# Allegro board mib_rev2_v58.brd
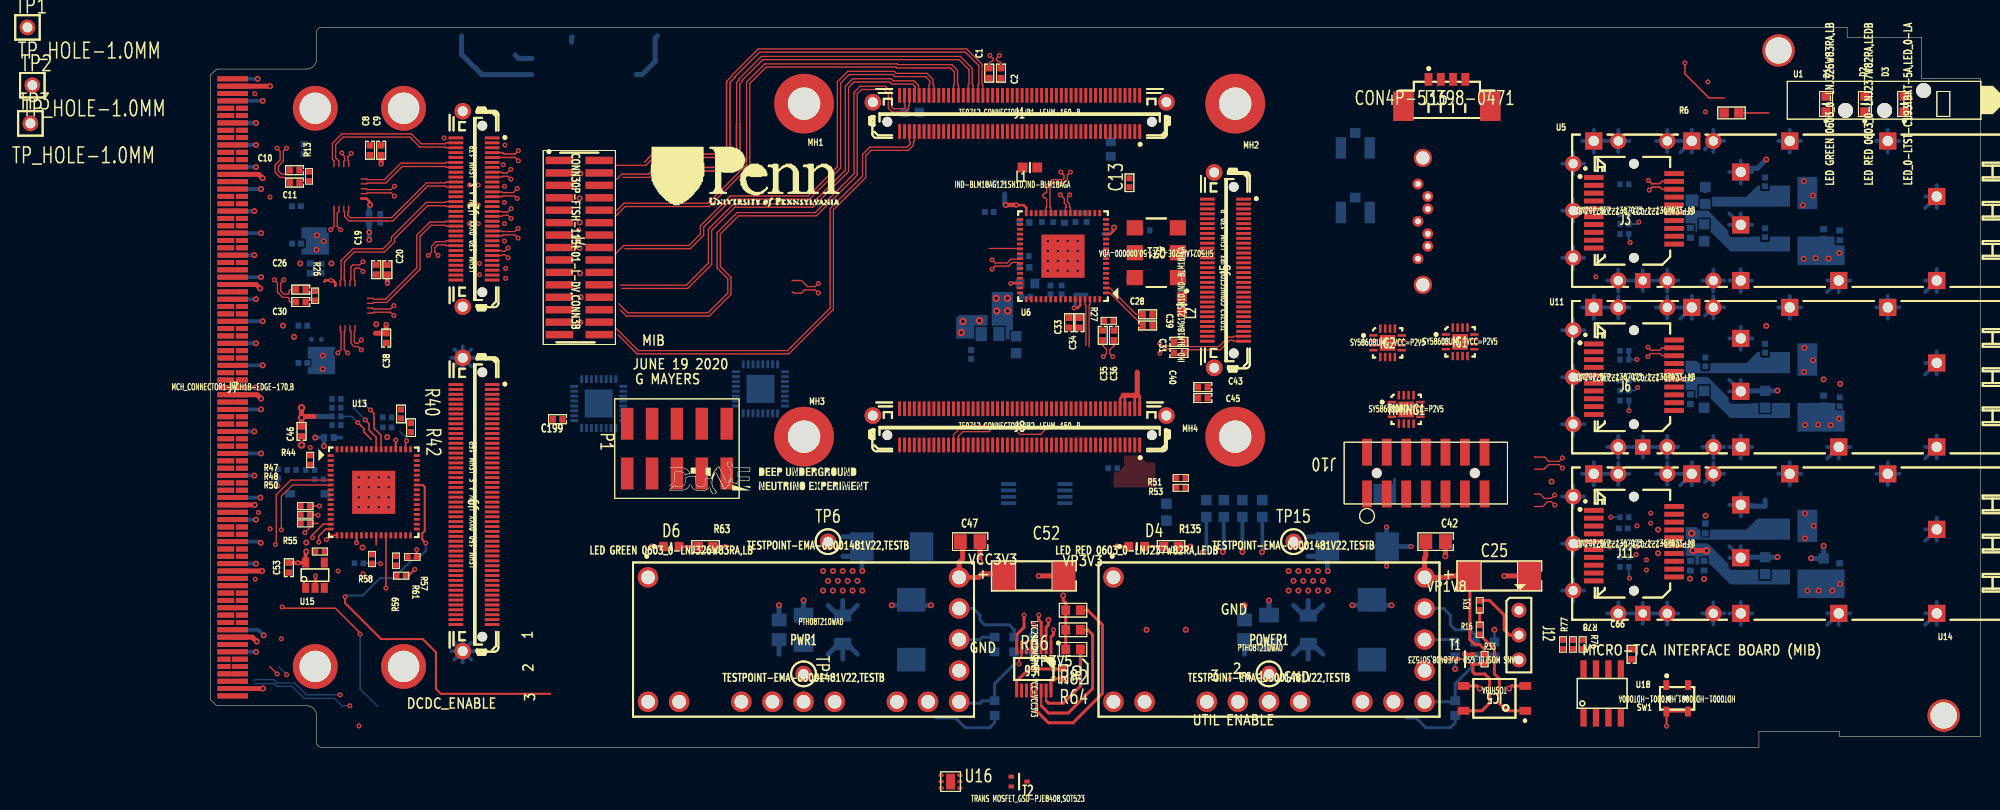
[diagram p0: board, top side]
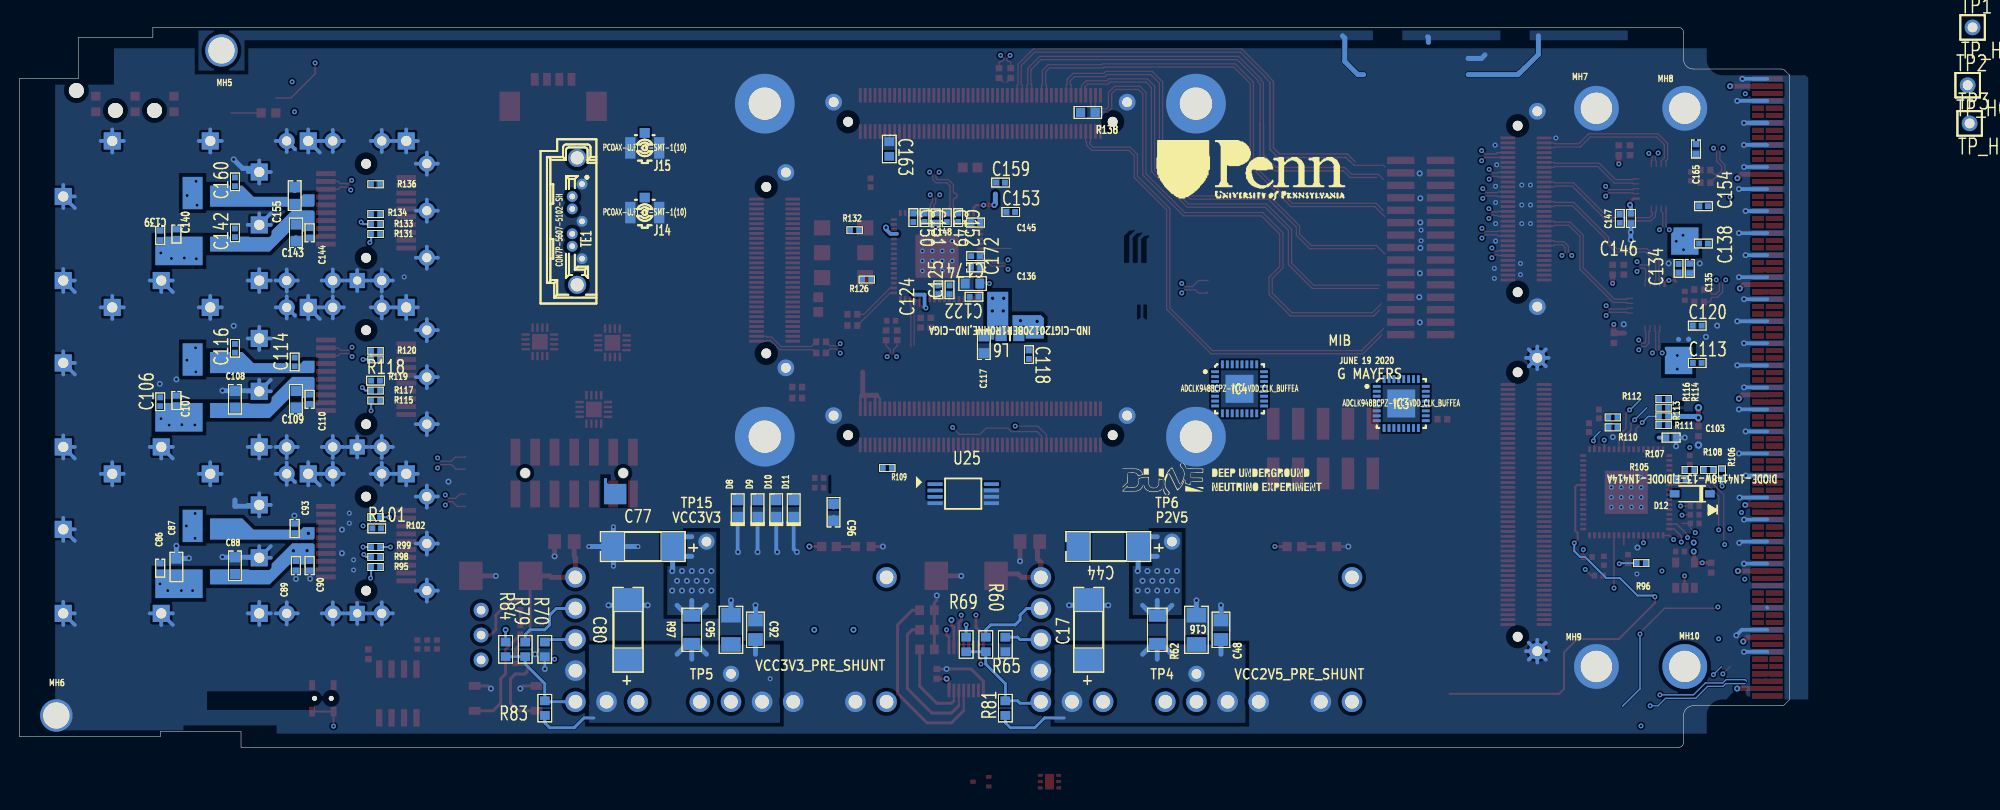
[diagram p1: board, bottom side, seen from below]

Outline 180.6 x 73.5 mm; copper layers: TOP, 02_GND, 03_SIG1, 04_GND, 05_PWR1, 06_GND, 07_SIG2, 08_GND, 09_SIG3, BOTTOM. Coordinates in mm from the lower left corner of the outline.
Outline path: 0,68.65 0.46,69.11 arc(0.62,69.21) 0.8,69.25 0.83,69.25 9.8,69.25 arc(10.51,69.54) 10.8,70.25 10.8,73.01 arc(10.95,73.36) 11.3,73.5 167,73.5 167,72.5 174.6,72.5 174.6,68.3 180.6,68.3 180.6,1.1 166.24,1.1 166.24,1.6 158,1.6 158,0 11.27,0 arc(11.06,0.06) 10.89,0.21 arc(10.82,0.34) 10.8,0.49 10.8,3.26 arc(10.5,3.96) 9.8,4.25 0.8,4.25 arc(0.62,4.29) 0.46,4.39 0,4.85 0,68.65

## Design rules (mm)
constraint set DEFAULT: min track width 0.127
net group AMC_N_PS: nets AMC_N_PS<0> AMC_N_PS<1>
net group AUXIO_0: nets AUXIO_N0 AUXIO_P0
net group AUXIO_1: nets AUXIO_N1 AUXIO_P1
net group AUXIO_2: nets AUXIO_N2 AUXIO_P2
net group AUXIO_3: nets AUXIO_N3 AUXIO_P3
net group AUXIO_4: nets AUXIO_N4 AUXIO_P4
net group AUXIO_5: nets AUXIO_N5 AUXIO_P5
net group AUXIO_6: nets AUXIO_N6 AUXIO_P6
net group AUXIO_7: nets AUXIO_N7 AUXIO_P7
net group CLKIN_N<2>: nets CLKIN_N<2> CLKIN_P<2>
net group DP_AUX_GBE_RX: nets AUX_GBE_RX_N AUX_GBE_RX_P
net group DP_AUX_GBE_TX: nets AUX_GBE_TX_N AUX_GBE_TX_P
net group DP_CLK0: nets CLK_N<0> CLK_P<0>
net group DP_CLK1: nets CLK_N<1> CLK_P<1>
net group DP_CLK_TST: nets CLK_TST_N CLK_TST_P
net group DP_DATA_IN0: nets DATA_IN_N<0> DATA_IN_P<0>
net group DP_DATA_IN1: nets DATA_IN_N<1> DATA_IN_P<1>
net group DP_DATA_IN2: nets DATA_IN_N<2> DATA_IN_P<2>
net group DP_DATA_IN3: nets DATA_IN_N<3> DATA_IN_P<3>
net group DP_DATA_IN4: nets DATA_IN_N<4> DATA_IN_P<4>
net group DP_DATA_IN5: nets DATA_IN_N<5> DATA_IN_P<5>
net group DP_DATA_IN6: nets DATA_IN_N<6> DATA_IN_P<6>
net group DP_DATA_IN7: nets DATA_IN_N<7> DATA_IN_P<7>
net group DP_DATA_IN8: nets DATA_IN_N<8> DATA_IN_P<8>
net group DP_DATA_IN9: nets DATA_IN_N<9> DATA_IN_P<9>
net group DP_DATA_IN10: nets DATA_IN_N<10> DATA_IN_P<10>
net group DP_DATA_IN11: nets DATA_IN_N<11> DATA_IN_P<11>
net group DP_DATA_OUT0: nets DATA_OUT_N<0> DATA_OUT_P<0>
net group DP_DATA_OUT1: nets DATA_OUT_N<1> DATA_OUT_P<1>
net group DP_DATA_OUT2: nets DATA_OUT_N<2> DATA_OUT_P<2>
net group DP_DATA_OUT3: nets DATA_OUT_N<3> DATA_OUT_P<3>
net group DP_DATA_OUT4: nets DATA_OUT_N<4> DATA_OUT_P<4>
net group DP_DATA_OUT5: nets DATA_OUT_N<5> DATA_OUT_P<5>
net group DP_DATA_OUT6: nets DATA_OUT_N<6> DATA_OUT_P<6>
net group DP_DATA_OUT7: nets DATA_OUT_N<7> DATA_OUT_P<7>
net group DP_DATA_OUT8: nets DATA_OUT_N<8> DATA_OUT_P<8>
net group DP_DATA_OUT9: nets DATA_OUT_N<9> DATA_OUT_P<9>
net group DP_DATA_OUT10: nets DATA_OUT_N<10> DATA_OUT_P<10>
net group DP_DATA_OUT11: nets DATA_OUT_N<11> DATA_OUT_P<11>
net group DP_DC_REF_CLK0: nets DC_REF_CLK_N<0> DC_REF_CLK_P<0>
net group DP_DC_REF_CLK1: nets DC_REF_CLK_N<1> DC_REF_CLK_P<1>
net group DP_DC_REF_CLK2: nets DC_REF_CLK_N<2> DC_REF_CLK_P<2>
net group DP_DC_REF_CLK3: nets DC_REF_CLK_N<3> DC_REF_CLK_P<3>
net group DP_DC_REF_CLK4: nets DC_REF_CLK_N<4> DC_REF_CLK_P<4>
net group DP_DC_REF_CLK5: nets DC_REF_CLK_N<5> DC_REF_CLK_P<5>
net group DP_DC_REF_CLK6: nets DC_REF_CLK_N<6> DC_REF_CLK_P<6>
net group DP_DC_REF_CLK7: nets DC_REF_CLK_N<7> DC_REF_CLK_P<7>
net group DP_DC_REF_CLK8: nets DC_REF_CLK_N<8> DC_REF_CLK_P<8>
net group DP_DC_REF_CLK9: nets DC_REF_CLK_N<9> DC_REF_CLK_P<9>
net group DP_DC_REF_CLK10: nets DC_REF_CLK_N<10> DC_REF_CLK_P<10>
net group DP_DC_REF_CLK11: nets DC_REF_CLK_N<11> DC_REF_CLK_P<11>
net group DP_DFF_REF_CLK0: nets DFF_REF_CLK_N<0> DFF_REF_CLK_P<0>
net group DP_DFF_REF_CLK1: nets DFF_REF_CLK_N<1> DFF_REF_CLK_P<1>
net group DP_DFF_REF_CLK2: nets DFF_REF_CLK_N<2> DFF_REF_CLK_P<2>
net group DP_GBE_RX: nets GBE_RX_N GBE_RX_P
net group DP_GBE_TX: nets GBE_TX_N GBE_TX_P
net group DP_REF_CLK0: nets REF_CLK_N<0> REF_CLK_P<0>
net group DP_REF_CLK1: nets REF_CLK_N<1> REF_CLK_P<1>
net group DP_REF_CLK2: nets REF_CLK_N<2> REF_CLK_P<2>
net group DP_REF_CLK3: nets REF_CLK_N<3> REF_CLK_P<3>
net group DP_REF_CLK4: nets REF_CLK_N<4> REF_CLK_P<4>
net group DP_REF_CLK5: nets REF_CLK_N<5> REF_CLK_P<5>
net group DP_REF_CLK6: nets REF_CLK_N<6> REF_CLK_P<6>
net group DP_REF_CLK7: nets REF_CLK_N<7> REF_CLK_P<7>
net group DP_REF_CLK8: nets REF_CLK_N<8> REF_CLK_P<8>
net group DP_REF_CLK9: nets REF_CLK_N<9> REF_CLK_P<9>
net group DP_REF_CLK10: nets REF_CLK_N<10> REF_CLK_P<10>
net group DP_REF_CLK11: nets REF_CLK_N<11> REF_CLK_P<11>
net group DP_SFP2_CLKGEN: nets SFP2_CLKGEN_N SFP2_CLKGEN_P
net group DP_SFP_TD0: nets SFP_TD_N<0> SFP_TD_P<0>
net group DP_SFP_TD1: nets SFP_TD_N<1> SFP_TD_P<1>
net group DP_SFP_TD2: nets SFP_TD_N<2> SFP_TD_P<2>
net group DP_TIMING.UPSTREAM_DATA0: nets TIMING.UPSTREAM_DATA_N<0> TIMING.UPSTREAM_DATA_P<0>
net group DP_TIMING.UPSTREAM_DATA1: nets TIMING.UPSTREAM_DATA_N<1> TIMING.UPSTREAM_DATA_P<1>
net group DPDATA_FROM_UPSTREAM0: nets DATA_FROM_UPSTREAM_N<0> DATA_FROM_UPSTREAM_P<0>
net group DPDATA_FROM_UPSTREAM1: nets DATA_FROM_UPSTREAM_N<1> DATA_FROM_UPSTREAM_P<1>
net group DPDATA_FROM_UPSTREAM2: nets DATA_FROM_UPSTREAM_N<2> DATA_FROM_UPSTREAM_P<2>
net group DPDFF_CLK0: nets DFF_CLK_N<0> DFF_CLK_P<0>
net group DPDFF_CLK1: nets DFF_CLK_N<1> DFF_CLK_P<1>
net group DPDFF_CLK2: nets DFF_CLK_N<2> DFF_CLK_P<2>
net group DPSCOPE: nets SCOPE_N SCOPE_P
net group DPSFP_DATA_OUT0: nets SFP_DATA_OUT_N<0> SFP_DATA_OUT_P<0>
net group DPSFP_DATA_OUT1: nets SFP_DATA_OUT_N<1> SFP_DATA_OUT_P<1>
net group DPSFP_DATA_OUT2: nets SFP_DATA_OUT_N<2> SFP_DATA_OUT_P<2>
net group DPSFP_RD0: nets SFP_RD_N<0> SFP_RD_P<0>
net group DPSFP_RD1: nets SFP_RD_N<1> SFP_RD_P<1>
net group DPSFP_RD2: nets SFP_RD_N<2> SFP_RD_P<2>
net group DPUDATA_IN0: nets UDATA_IN_N<0> UDATA_IN_P<0>
net group DPUDATA_IN1: nets UDATA_IN_N<1> UDATA_IN_P<1>
net group DPUDATA_IN2: nets UDATA_IN_N<2> UDATA_IN_P<2>
net group RCLK_N0: nets RCLK_N0 REFCLK_OUT0_N
net group RCLK_N1: nets RCLK_N1 REFCLK_OUT1_N
net group RCLK_P0: nets RCLK_P0 REFCLK_OUT0_P
net group RCLK_P1: nets RCLK_P1 REFCLK_OUT1_P
net group VP12: nets PRESENCE_12V VP12
net group AMC_GA: nets AMC_GA<0> AMC_GA<1> AMC_GA<2>
net group BP_1: nets AMC_N_ENABLE IMPB_SCL IMPB_SDA PWR_ON TCK_2 TDI_2 TDO_2 TMS_2
net group CLKGEN_IO_1: nets CLK_INTR CLK_LOL CLK_RST CLK_SCL CLK_SDA CLK_SEL0 CLK_SEL1
net group CLKIN_N<0>: nets CLKIN_N<0> CLKIN_P<0> SFP0_CLKGEN_N SFP0_CLKGEN_P
net group CLKIN_N<1>: nets CLKIN_N<1> CLKIN_P<1> SFP1_CLKGEN_N SFP1_CLKGEN_P
net group CLKIN_N<3>: nets CLKIN_N<3> CLKIN_P<3> FBCLK_N FBCLK_P
net group POWER: nets DCDC_2V5_PG DCDC_3V3_PG DCDC_ENABLE LDO_1V8_PG SENSE_I2C_SCL SENSE_I2C_SDA
net group SFP_LOS: nets SFP_LOS<0> SFP_LOS<1> SFP_LOS<2>
net group SFP_RATE_SELECT: nets SFP_RATE_SELECT<0> SFP_RATE_SELECT<1> SFP_RATE_SELECT<2>
net group SFP_SCL: nets SFP_SCL<0> SFP_SCL<1> SFP_SCL<2>
net group SFP_SDA: nets SFP_SDA<0> SFP_SDA<1> SFP_SDA<2>
net group SFP_TX_DISABLE: nets SFP_TX_DISABLE<0> SFP_TX_DISABLE<1> SFP_TX_DISABLE<2>
net group SFP_TX_FAULT: nets SFP_TX_FAULT<0> SFP_TX_FAULT<1> SFP_TX_FAULT<2>
net group TIMING.UPSTREAM_DATA_N: nets TIMING.UPSTREAM_DATA_N<2>
net group TIMING.UPSTREAM_DATA_P: nets TIMING.UPSTREAM_DATA_P<2>
net group UPSTREAM_DATA_N_: nets UPSTREAM_DATA_N_<0> UPSTREAM_DATA_N_<1> UPSTREAM_DATA_N_<2>
net group UPSTREAM_DATA_P: nets UPSTREAM_DATA_P<0> UPSTREAM_DATA_P<1> UPSTREAM_DATA_P<2>

## Placement (name value [footprint] x y rotation side)
C1  0.1UF  [CAP0402]  79.46 68.83 90 top
C2  0.1UF  [CAP0402]  80.65 68.83 90 top
C8  100nF  [CAP0402]  16.26 60.96 90 top
C9  1UF  [CAP0402]  17.4 60.96 90 top
C10  0.1UF  [CAP0402]  8.56 58.93 0 top
C11  0.1UF  [CAP0402]  8.56 57.66 0 top
C13  100nF  [C0402]  93.77 57.64 90 top
C16  100UF  [CAP1206]  60.51 12 90 bottom
C17  470UF  [CAP2917]  71.51 12 90 bottom
C19  100nF  [CAP0402]  16.9 48.77 90 top
C20  1UF  [CAP0402]  18.04 48.77 90 top
C25  470UF  [CAP2917]  131.51 17.5 0 top
C26  0.1UF  [CAP0402]  9.2 46.74 0 top
C28  0.1UF  [CAP0402]  95.62 44.21 180 top
C30  0.1UF  [CAP0402]  9.2 45.47 0 top
C31  0.1UF  [CAP0402]  95.62 43.07 180 top
C33  0.1UF  [CAP0402]  87.61 43.35 270 top
C34  0.1UF  [CAP0402]  88.66 43.35 270 top
C35  0.1UF  [CAP0402]  91.04 42.06 90 top
C36  0.1UF  [CAP0402]  92.18 42.06 90 top
C38  1UF  [CAP0402]  17.91 41.78 270 top
C39  0.1UF  [CAP0402]  98.81 41.4 180 top
C40  0.1UF  [CAP0402]  98.81 40.26 180 top
C42  0.1UF  [CAP0805]  125.01 21 0 top
C43  0.1UF  [CAP0402]  101.25 36.78 0 top
C44  470UF  [CAP2917]  69.51 20.5 0 bottom
C45  0.1UF  [CAP0402]  101.25 35.66 0 top
C46  0.47UF  [CAP0402]  9.28 32.26 270 top
C47  0.1UF  [CAP0805]  77.51 21 0 top
C48  0.1UF  [CAP0805]  58.01 12 90 bottom
C52  470UF  [CAP2917]  84.01 17.5 0 top
C53  0.1UF  [CAP0402]  7.98 18.34 270 top
C66  0.1UF  [CAP0402]  145.01 9.5 270 top
C77  470UF  [CAP2917]  117.01 20.5 0 bottom
C80  470UF  [CAP2917]  118.51 12 90 bottom
C86  0.1UF  [CAP0402]  166.25 18.29 90 bottom
C87  10UF  [CAP0603]  164.6 18.41 90 bottom
C88  22UF  [CAP0603]  158.63 18.54 90 bottom
C89  1UF  [CAP0402]  152.41 18.54 270 bottom
C90  0.1UF  [CAP0402]  151.01 18.54 270 bottom
C91  0.1UF  [CAP0402]  87.01 7.5 270 top
C92  0.1UF  [CAP0805]  105.51 12 90 bottom
C93  0.1UF  [CAP0402]  152.53 22.35 90 bottom
C95  100UF  [CAP1206]  108.01 12 90 bottom
C96  22UF  [CAP0603]  97.54 24 270 bottom
C103  0.1UF  [CAP0402]  12.07 31.62 180 bottom
C106  100nF  [C0402]  166.25 35.28 90 bottom
C107  0.1UF  [CAP0402]  164.6 35.41 90 bottom
C108  10UF  [CAP0603]  158.63 35.53 90 bottom
C109  22UF  [CAP0603]  152.41 35.53 270 bottom
C110  1UF  [CAP0402]  151.01 35.53 270 bottom
C113  100nF  [C0402]  9.4 39.24 180 bottom
C114  1uF  [C0402]  152.53 39.34 90 bottom
C116  1uF  [C0402]  158.63 40.74 90 bottom
C117  22UF  [CAP0603]  82.21 41.1 270 bottom
C118  1uF  [C0402]  77.61 40.1 270 bottom
C120  100nF  [C0402]  9.4 43.05 180 bottom
C122  100nF  [C0402]  83.21 46 0 bottom
C124  1nF  [C0402]  86.85 46.71 90 bottom
C125  1nF  [C0402]  85.7 46.71 90 bottom
C134  1uF  [C0402]  11.31 48.9 90 bottom
C135  100nF  [CAP0402]  10.17 48.9 90 bottom
C136  100nF  [CAP0402]  83.04 49 0 bottom
C138  100nF  [C0402]  8.77 51.44 180 bottom
C139  100nF  [CAP0402]  166.25 52.27 90 bottom
C140  0.1UF  [CAP0402]  164.6 52.4 90 bottom
C142  100nF  [C0402]  158.63 52.53 90 bottom
C143  22UF  [CAP0603]  152.41 52.53 270 bottom
C144  1UF  [CAP0402]  151.01 52.53 270 bottom
C145  0.1UF  [CAP0402]  83.04 53.58 0 bottom
C146  100nF  [C0402]  17.3 54 270 bottom
C147  1UF  [CAP0402]  16.16 54 270 bottom
C148  100nF  [CAP0402]  87.13 54.05 270 bottom
C149  100nF  [C0402]  85.98 54.08 270 bottom
C150  100nF  [C0402]  89.39 54.08 270 bottom
C151  100nF  [C0402]  88.25 54.08 270 bottom
C152  100nF  [C0402]  84.82 54.08 270 bottom
C153  100nF  [C0402]  79.46 54.66 180 bottom
C154  100nF  [C0402]  8.77 55.24 180 bottom
C155  10UF  [CAP0603]  152.53 56.34 90 bottom
C159  100nF  [C0402]  80.5 57.66 180 bottom
C160  1uF  [C0402]  158.63 57.73 90 bottom
C163  10uF  [C0603]  91.85 61.09 270 bottom
C165  100nF  [CAP0402]  9.53 61.09 90 bottom
C172  10uF  [C0603]  83.36 47.35 180 bottom
C174  100nF  [C0402]  83.04 50.15 0 bottom
C199  100nF  [CAP0402]  35.41 33.5 0 top
D1  GREEN  [LEDC1608X80N]  164.85 65.68 90 top
D2  RED  [LEDC1608X80N]  168.81 65.68 90 top
D3  LTST-C170TBKT  [LEDC1608X80N]  172.83 65.68 90 top
D4  RED  [LEDC1608X80N]  94.51 20.5 0 top
D6  GREEN  [LEDC1608X80N]  47.01 20.5 0 top
D8  PGB1010603NR  [D0603]  107.32 24.38 90 bottom
D9  PGB1010603NR  [D0603]  105.29 24.38 90 bottom
D10  PGB1010603NR  [D0603]  103.39 24.38 90 bottom
D11  PGB1010603NR  [D0603]  101.61 24.38 90 bottom
D12  1N4148  [SOD123]  9.91 25.88 0 bottom
IC1  -  [QFN50P300X300X90-17N-S160]  127.51 41.4 0 top
IC2  -  [QFN50P300X300X90-17N-S160]  120.11 41.3 0 top
IC3  -  [QFN50P500X500X100-33N-S285]  39.61 35.1 180 bottom
IC4  -  [QFN50P500X500X100-33N-S285]  56.11 36.6 180 bottom
IC5  -  [TOSHIBA_11-4M1S]  131.01 5 180 top
IC6  -  [SOP50P490X110-16N]  84.01 8 270 top
J1  LSHM-150-03.0-L-DV-A-S-K-TR  [SAMTEC_LSHM-150-04-0-L-DV-A-S]  82.56 64.77 0 top
J2  LSHM-130-03.0-L-DV-A-S-K-TR  [SAMTEC_LSHM-130-04-0-L-DV-A-S]  26.83 54.97 90 top
J3  1367073-1  [TYCO_1367073]  145.24 54.78 0 top
J4  -  [FTSH-115-01-L-DV]  37.62 51.66 270 top
J5  LSHM-130-03.0-L-DV-A-S-K-TR  [SAMTEC_LSHM-130-04-0-L-DV-A-S]  103.51 48.72 90 top
J6  1367073-1  [TYCO_1367073]  145.24 37.79 0 top
J7  MCH_TG1-EDGE-170  [AMC0_R2_BPLUS_PCB_EDGE]  2.25 36.75 0 top
J8  LSHM-150-03.0-L-DV-A-S-K-TR  [SAMTEC_LSHM-150-04-0-L-DV-A-S]  82.56 32.77 0 top
J9  LSHM-150-03.0-L-DV-A-S-K-TR  [SAMTEC_LSHM-150-04-0-L-DV-A-S]  26.83 24.79 90 top
J10  7X2RECPT_SMD_2MM  [HDR14PINSMD]  124.01 28 180 top
J11  1367073-1  [TYCO_1367073]  145.24 20.8 0 top
J12  HDR1X3  [HDR_1X3]  133.51 14 270 top
J14  -  [HIROSE_U-FL-R-SMT-1_10]  116.81 54.6 180 bottom
J15  -  [HIROSE_U-FL-R-SMT-1_10]  116.81 61.2 180 bottom
J16  -  [MOLEX_53398-0471]  124.91 66.4 0 top
L1  120  OHM@100MHZ  [INDC1608X95N]  83.61 59.2 0 top
L2  120  OHM@100MHZ  [INDC1608X95N]  99.11 45.2 90 top
L6  1 UH  [INDC2013X105N]  79.54 42.2 0 bottom
MH1  MT_HOLE  [MOUNTHOLE]  60.56 65.72 0 top
MH2  MT_HOLE  [MOUNTHOLE]  104.56 65.72 0 top
MH3  MT_HOLE  [MOUNTHOLE]  60.56 31.72 0 top
MH4  MT_HOLE  [MOUNTHOLE]  104.56 31.72 0 top
MH5  MT_HOLE  [MOUNTHOLE]  160 71.15 180 bottom
MH6  MT_HOLE  [MOUNTHOLE]  176.85 3.25 180 bottom
MH7  MT_HOLE  [MOUNTHOLE]  19.69 65.25 180 bottom
MH8  MT_HOLE  [MOUNTHOLE]  10.67 65.25 180 bottom
MH9  MT_HOLE  [MOUNTHOLE]  19.69 8.26 180 bottom
MH10  MT_HOLE  [MOUNTHOLE]  10.67 8.26 180 bottom
NOREF  -  []  -27.5 136.85 0 top
NOREF#2  -  []  10.8 72.31 0 top
NOREF#3  -  []  12.04 125.75 90 top
NOREF#4  -  []  5.36 4.25 90 top
NOREF#5  -  []  0.92 4.25 90 top
NOREF#6  -  []  153.74 4.81 0 top
NOREF#7  -  []  153.92 4.25 0 top
NOREF#8  -  []  -27.5 124.03 0 top
NOREF#9  -  []  46.82 25.83 0 top
NOREF#10  -  []  15.11 0 90 top
NOREF#11  -  []  157.38 0 90 top
NOREF#12  -  []  44.48 53.98 0 top
NOREF#13  -  []  23.75 102.67 90 top
NOREF#14  -  []  -26.64 123.32 0 top
NOREF#15  -  []  158 0.73 0 top
NOREF#16  -  []  161.05 4 90 top
NOREF#17  -  []  0 64.12 0 top
NOREF#18  -  []  178.32 68.3 90 top
NOREF#19  -  []  167 73.04 0 top
NOREF#20  -  []  0 39.45 0 top
NOREF#21  -  []  -255.82 -99.62 0 top
NOREF#22  -  []  65.03 54.66 180 bottom
NOREF#23  -  []  68.05 25.73 180 bottom
NOREF#24  -  []  12.32 141.05 270 bottom
P1  RECP5X2  [RECPT5X2_100MIL_SM]  42.51 30.5 270 top
POWER1  -  [PWS_TI_ECP-R-PDSS-T14]  108.01 11 0 top
PWR1  -  [PWS_TI_ECP-R-PDSS-T14]  60.51 11 0 top
QZ1  50MHz  [OSCSC254P500X700X100-6N]  96.51 50.5 180 top
R6  160 OHM  [RES0603]  155.2 64.77 180 top
R13  4.99K  [RES0402]  10.04 58.29 270 top
R16  24.9  [RES0402]  129.51 12 90 top
R26  0  [RES0402]  10.67 46.1 270 top
R27  100  [RES0402]  91.66 43.55 0 top
R31  24.9  [RES0402]  129.51 14.5 90 top
R33  150K  [RES0402]  130.01 9 270 top
R40  1k  [C0402]  19.44 34.04 270 top
R42  1k  [C0402]  20.45 32.64 270 top
R44  33K  [RES0402]  10.17 29.34 270 top
R47  33K  [RES0402]  9.66 24.64 0 top
R48  24.9  [RES0402]  9.66 23.75 0 top
R50  24.9  [RES0402]  9.66 22.86 0 top
R51  24.9  [RES0402]  99.01 27.5 180 top
R53  24.9  [RES0402]  99.01 26.5 180 top
R55  49.9  [RES0402]  11.16 19.99 0 top
R57  33K  [RES0402]  20.58 19.43 180 top
R58  2.2K  [RES0402]  16.46 19.23 270 top
R59  4.99K  [RES0402]  18.93 19.05 270 top
R60  1.6k  [C0603]  80.01 10.5 90 bottom
R61  33K  [RES0402]  19.44 17.53 180 top
R62  0.005  [RES1206]  64.51 12 90 bottom
R63  249 OHM  [RES0603]  50.51 20.5 0 top
R64  00  [C0603]  88.01 12 0 top
R65  XX  [C0603]  82.01 10.5 270 bottom
R66  00  [C0603]  88.01 10 0 top
R69  00  [C0603]  84.01 10.5 90 bottom
R70  1.6k  [C0603]  127.01 10 90 bottom
R76  -  [RES0402]  140.01 10.5 90 top
R77  0  [RES0402]  138.01 10.5 270 top
R78  -  [RES0402]  139.01 10.5 90 top
R79  XX  [C0603]  129.01 10 270 bottom
R81  XX  [C0603]  80.01 4 90 bottom
R82  00  [C0603]  88.01 14 0 top
R83  XX  [C0603]  127.01 4 90 bottom
R84  00  [C0603]  131.01 10 90 bottom
R95  4.99K  [RES0402]  144.28 18.41 180 bottom
R96  4.99K  [RES0402]  15.12 18.8 0 bottom
R97  0.005  [RES1206]  112.01 12 90 bottom
R98  4.99K  [RES0402]  144.28 19.43 180 bottom
R99  4.99K  [RES0402]  144.28 20.45 180 bottom
R101  1k  [C0402]  144.16 22.35 180 bottom
R102  33  [RES0402]  144.28 23.5 180 bottom
R105  330  [RES0402]  11.05 27.36 0 bottom
R106  10K  [RES0402]  6.86 27.94 270 bottom
R107  1K  [RES0402]  10.17 28.32 180 bottom
R108  1K  [RES0402]  8.26 28.32 0 bottom
R109  1K  [RES0402]  92.05 28.5 180 bottom
R110  30K  [RES0402]  18.01 32.66 180 bottom
R111  150K  [RES0402]  12.83 32.89 0 bottom
R112  4.99K  [RES0402]  18.01 33.68 0 bottom
R113  1K  [RES0402]  12.83 33.78 0 bottom
R114  4.99K  [RES0402]  12.83 34.67 0 bottom
R115  4.99K  [RES0402]  144.28 35.41 180 bottom
R116  4.99K  [RES0402]  12.83 35.56 0 bottom
R117  4.99K  [RES0402]  144.28 36.42 180 bottom
R118  1k  [C0402]  144.28 37.44 180 bottom
R119  2.2K  [RES0402]  144.28 39.6 180 bottom
R120  2.2K  [RES0402]  144.28 40.49 180 bottom
R126  2.2K  [RES0402]  94.14 47.76 0 bottom
R131  4.99K  [RES0402]  144.28 52.4 180 bottom
R132  4.99K  [RES0402]  95.39 52.79 180 bottom
R133  4.99K  [RES0402]  144.28 53.42 180 bottom
R134  100  [RES0402]  144.28 54.43 180 bottom
R135  249 OHM  [RES0603]  98.01 20.5 0 top
R136  10K  [RES0402]  144.28 57.48 180 bottom
R138  10M  [RES0603]  71.58 64.82 180 bottom
SW1  HDT0001  [SW_HDT0001]  149.65 5 180 top
T1  -  [SOTFL50P160X60-3N]  128.01 9 180 top
T2  -  [SOTFL50P160X60-3N]  82.51 -3.5 0 top
TE1  -  [3M_5607-5102-SH]  123.71 53.7 90 bottom
TIMING1  -  [QFN50P300X300X90-17N-S160]  122.01 34.5 0 top
TP1  -  [TP_HOLE_10]  -18.69 73.5 0 top
TP2  -  [TP_HOLE_10]  -18.19 67.6 0 top
TP3  -  [TP_HOLE_10]  -18.39 63.7 0 top
TP4  5002 WHITE  [TP_KEYSTONE_5000A]  60.51 7.5 0 top
TP5  5002 WHITE  [TP_KEYSTONE_5000A]  108.01 7.5 0 top
TP6  5002 WHITE  [TP_KEYSTONE_5000A]  63.01 21 0 top
TP15  5002 WHITE  [TP_KEYSTONE_5000A]  110.51 21 0 top
U1  5151230F  [LP_515XXX]  170.82 65.02 270 top
U5  2227023-1  [SFP_CAGE]  145.24 54.78 180 top
U6  SI5395A-A-GM  [QFN_64]  86.98 50.15 180 top
U11  2227023-1  [SFP_CAGE]  145.24 37.79 180 top
U13  ATMEGA128A-MU  [QFN_64]  16.64 26.04 0 top
U14  2227023-1  [SFP_CAGE]  145.24 20.8 180 top
U15  SN74LVC1G06  [SOT23-5]  10.65 17.58 90 top
U16  TPS74618PQWDRVRQ1  [6-WSON_2X2]  75.51 -3.5 0 top
U18  24AA025E48T-I/SN  [SOIC8]  142.01 5.5 90 top
U25  LM75AIMME/NOPB  [TSSOP8_65P440X300MM]  84.31 25.9 180 bottom

## Library data of the parts
C1 C2 C39 C40 C43 C45 = CAP_NP_0: Tolerance: TOL?; User Part Number: 445-7348-2-ND; part number: CAP_NP_0-445-7348-2-ND,CAP_NP_0; room: TE0712
C8 C139 C148 C165 = CAPCERSMDCL2: Tolerance: 10%; User Part Number: CC0402_100NF_16V_10%_X7R; part number: CAPCERSMDCL2_0402-100NF,16V_GEN; tolerance: 10%; room: CLK_FO_6_11
C9 C147 = CAP_NP: Tolerance: TOL?; User Part Number: GRM152R60J105ME15D; part number: CAP_NP-GRM152R60J105ME15D,CAP_NP; room: CLK_FO_6_11
C10 C11 = CAP_NP_0: Tolerance: TOL?; User Part Number: 445-7348-2-ND; part number: CAP_NP_0-445-7348-2-ND,CAP_NP_0; room: CLK_FO_0_5
C13 C106 C113 C120 C122 = CAPCERSMDCL2: part number: CAPCERSMDCL2_0402-100NF,16V_GEN; tolerance: 10%; room: SFP_DFF_AND_FANOUT
C16 C95 = CAP_NP: Tolerance: TOL?; User Part Number: GRM31CD80J107ME39K; part number: CAP_NP-GRM31CD80J107ME39K,CAP_NP; room: MAIN_PWR
C17 C25 C44 C52 C77 C80 = CAP_POL: part number: CAP_POL-6TPE470MAZU,CAP_POL; room: MAIN_PWR
C19 C135 C136 C199 = CAPCERSMDCL2: Tolerance: 10%; User Part Number: CC0402_100NF_16V_10%_X7R; part number: CAPCERSMDCL2_0402-100NF,16V_GEN; tolerance: 10%; room: CLK_FO_0_5
C20 C38 = CAP_NP: Tolerance: TOL?; User Part Number: GRM152R60J105ME15D; part number: CAP_NP-GRM152R60J105ME15D,CAP_NP; room: CLK_FO_0_5
C26 C30 = CAP_NP_0: Tolerance: TOL?; User Part Number: 445-7348-2-ND; part number: CAP_NP_0-445-7348-2-ND,CAP_NP_0; room: CLK_FO_6_11
C28 C31 C33-C36 = CAP_NP_0: Tolerance: TOL?; User Part Number: 445-7348-2-ND; part number: CAP_NP_0-445-7348-2-ND,CAP_NP_0; room: CLK_GEN_X12
C42 C47 C48 C92 = CAP_NP: Tolerance: TOL?; User Part Number: 445-8173-1-ND; part number: CAP_NP-445-8173-1-ND,CAP_NP; room: MAIN_PWR
C46 = CAP_NP: Tolerance: TOL?; User Part Number: GRM155R60J474KE19J; part number: CAP_NP-GRM155R60J474KE19J,CAP_NP; room: MMC_DISCRETE
C53 C93 = CAP_NP: Tolerance: TOL?; User Part Number: C0402C104K9RACTU; part number: CAP_NP-C0402C104K9RACTU,CAP_NP; room: MMC_DISCRETE
C66 = CAP_NP: Tolerance: TOL?; User Part Number: 445-7348-2-ND; part number: CAP_NP-445-7348-2-ND,CAP_NP; room: EEPROM
C86 C90 C107 C140 C145 = CAP_NP: Tolerance: TOL?; User Part Number: 445-7348-2-ND; part number: CAP_NP-445-7348-2-ND,CAP_NP; room: SFP0
C87 C108 = CAP_NP: Tolerance: TOL?; User Part Number: GRM188R61A106KE69D; part number: CAP_NP-GRM188R61A106KE69D,CAP_NP; room: SFP0
C88 C96 C109 C117 C143 = CAP_NP: Tolerance: TOL?; User Part Number: GRM188R60J226MEA0D; part number: CAP_NP-GRM188R60J226MEA0D,CAP_NP; room: SFP0
C89 C110 C144 = CAP_NP: Tolerance: TOL?; User Part Number: GRT155R61E105ME01D; part number: CAP_NP-GRT155R61E105ME01D,CAP_NP; room: SFP0
C91 = CAP_NP_0: Tolerance: TOL?; User Part Number: 445-7348-2-ND; part number: CAP_NP_0-445-7348-2-ND,CAP_NP_0; room: MAIN_PWR
C103 = CAP_NP: Tolerance: TOL?; User Part Number: 445-7348-2-ND; part number: CAP_NP-445-7348-2-ND,CAP_NP; room: JTAG
C114 C116 C118 = CAPCERSMDCL2: part number: CAPCERSMDCL2_0402-1UF,16V; tolerance: 10%; room: SFP_DFF_AND_FANOUT
C124 C125 = CAPCERSMDCL2: part number: CAPCERSMDCL2_0402-1NF_X7R,50V; tolerance: 10%; room: SFP_DFF_AND_FANOUT
C134 C160 = CAPCERSMDCL2: part number: CAPCERSMDCL2_0402-1UF,16V; tolerance: 10%; room: CLK_GEN_X12
C138 C142 C146 C149-C154 C159 C174 = CAPCERSMDCL2: part number: CAPCERSMDCL2_0402-100NF,16V_GEN; tolerance: 10%; room: CLK_GEN_X12
C155 = CAP_NP: Tolerance: TOL?; User Part Number: GRM188R61A106KE69D; part number: CAP_NP-GRM188R61A106KE69D,CAP_NP; room: CLK_FO_6_11
C163 C172 = CAPCERSMDCL2: part number: CAPCERSMDCL2_0603-10UF,6.3V; tolerance: 20%; room: CLK_GEN_X12
D1 = LED GREEN 0603_0: part number: LED GREEN 0603_0-LNJ326W83RA,LED GREEN 0603_0; room: MMC
D2 = LED RED 0603_0: part number: LED RED 0603_0-LNJ237W82RA,LED RED 0603_0; room: MMC
D3 = LED_0: part number: LED_0-LTST-C193TBKT-5A,LED_0; room: MMC
D4 = LED RED 0603_0: part number: LED RED 0603_0-LNJ237W82RA,LED RED 0603_0; room: VCC3V3I_V
D6 = LED GREEN 0603_0: part number: LED GREEN 0603_0-LNJ326W83RA,LED GREEN 0603_0; room: POWER
D8-D11 = TVS_2X: Tolerance: TOL?; part number: TVS_2X-PGB1010603NR,TVS_2X; room: JTAG
D12 = DIODE: part number: DIODE-1N4148W-13-F,DIODE; room: MMC_DISCRETE
IC1 IC2 TIMING1 = SY58608U: part number: SY58608UMG; room: SFP_DFF_AND_FANOUT
IC3 = ADCLK948: part number: ADCLK948BCPZ; room: CLK_FO_0_5
IC4 = ADCLK948: part number: ADCLK948BCPZ; room: CLK_FO_6_11
IC5 = OPTOCOUPLER_AC_EC: part number: TOSHIBA; room: POWER
IC6 = LTC2991: part number: LTC2991CMS#PBF; room: POWER
J1 = TE0712 CONNECTOR-JB1: part number: TE0712 CONNECTOR-JB1-LSHM-150-03.0-L-DV-A-S-K-TR,TE0712 CONNECTOR-JB1
J2 = LSHM-130-0XXX-L-DV-A-S: part number: LSHM-130-0XXX-L-DV-A-S-LSHM-130-03.0-L-DV-A-S-K-TR,LSHM-130-0XXX-L-DV-A-S
J3 J6 J11 = CON20P_SFP-1367073-1: part number: CON20P_SFP-1367073-1-1367073-1,CON20P_SFP-1367073-1; room: SFP0
J4 = CONN30P: part number: CONN30P-FTSH-115-01-L-DV,CONN30P
J5 = TE0712 CONNECTOR-JB3: part number: TE0712 CONNECTOR-JB3-LSHM-130-03.0-L-DV-A-S-K-TR,TE0712 CONNECTOR-JB3
J7 = MCH_CONNECTOR1: part number: MCH_CONNECTOR1-MCH1B-EDGE-170,MCH_CONNECTOR1
J8 = TE0712 CONNECTOR-JB2: part number: TE0712 CONNECTOR-JB2-LSHM-150-03.0-L-DV-A-S-K-TR,TE0712 CONNECTOR-JB2
J9 = LSHM-150-0XXX-L-DV-A-S: part number: LSHM-150-0XXX-L-DV-A-S-LSHM-150-03.0-L-DV-A-S-K-TR,LSHM-150-0XXX-L-DV-A-S
J10 = 7X2RECPT_SMD_2MM: User Part Number: 878321420; part number: 7X2RECPT_SMD_2MM-878321420,7X2RECPT_SMD_2MM; room: JTAG
J12 = HDR1X3: part number: HDR1X3-HDR1X3,HDR1X3; room: USB-JTAG
J14 J15 = PCOAX: part number: PCOAX-U.FL-R-SMT-1(10); room: CLK_GEN_X12
J16 = CON4P: part number: CON4P-53398-0471
L1 L2 = IND: part number: IND-BLM18AG121SN1D,IND; room: CLK_GEN_X12
L6 = IND: part number: IND-CIGT201208EH1R0MNE,IND; room: SFP1
MH1-MH4 = MT_HOLE: part number: MT_HOLE-MT_HOLE,MT_HOLE; room: TE0712
MH5-MH10 = MT_HOLE: part number: MT_HOLE-MT_HOLE,MT_HOLE
P1 = RECPT 5X2 100MIL: part number: RECPT 5X2 100MIL-RECP5X2,RECPT 5X2 100MIL
POWER1 PWR1 = PTH08T210W: part number: PTH08T210WAD; room: POWER
QZ1 = OSC_6P_ENDIS_OUTP_OUTN: part number: SIT5021AI-2DE-25E-50.000000; room: CLK_GEN_X12
R6 = R: Tolerance: TOL?; User Part Number: ERJ-3EKF1600V; part number: R-ERJ-3EKF1600V,R; room: MMC
R13 = R: Tolerance: TOL?; User Part Number: ERJ-2RKF4991X; part number: R-ERJ-2RKF4991X,R; room: TE0712
R16 R31 R48 R50 R51 R53 = R: Tolerance: TOL?; User Part Number: 311-24.9LRCT-ND; part number: R-311-24.9LRCT-ND,R; room: JTAG
R26 = R: Tolerance: TOL?; User Part Number: EMA-00007500V42; part number: R-EMA-00007500V42,R; room: SFP_DFF_AND_FANOUT
R27 = R: Tolerance: TOL?; User Part Number: ERJ-2RKF1000X; part number: R-ERJ-2RKF1000X,R; room: CLK_GEN_X12
R33 R111 = R: Tolerance: TOL?; User Part Number: ERJ-2RKF1503X; part number: R-ERJ-2RKF1503X,R; room: MMC_DISCRETE
R40 R42 R101 R118 = RSMD0402: part number: RSMD0402_1/16W-1K,1%; tolerance: 1%; room: SFP_DFF_AND_FANOUT
R44 R47 R57 R61 = R: Tolerance: TOL?; User Part Number: ERJ-2RKF3302X; part number: R-ERJ-2RKF3302X,R; room: MMC_DISCRETE
R55 = R: Tolerance: TOL?; User Part Number: ERJ-2RKF49R9X; part number: R-ERJ-2RKF49R9X,R; room: MMC_DISCRETE
R58 = R: Tolerance: TOL?; User Part Number: ERJ-2RKF2201X; part number: R-ERJ-2RKF2201X,R; room: MMC
R59 = R: Tolerance: TOL?; User Part Number: ERJ-2RKF4991X; part number: R-ERJ-2RKF4991X,R; room: VCC1V8
R60 R70 = RSMD0603: part number: RSMD0603_1/10W-1.6K,1%; tolerance: 1%; room: POWER
R62 R97 = R: Tolerance: TOL?; User Part Number: PMR18EZPFU5L00; part number: R-PMR18EZPFU5L00,R; room: MAIN_PWR
R63 = R: Tolerance: TOL?; User Part Number: EMA-00003608; part number: R-EMA-00003608,R; room: POWER
R64 R66 R69 R82 R84 = RSMD0603: part number: RSMD0603_-00,; room: POWER
R65 R79 R81 R83 = RSMD0603: part number: RSMD0603_1/10W-XX,1%; tolerance: 1%; room: POWER
R76 R78 = R: Tolerance: TOL?; User Part Number: NO_STUFF; part number: R-NO_STUFF,R; room: EEPROM
R77 = R: Tolerance: TOL?; User Part Number: EMA-00007500V42; part number: R-EMA-00007500V42,R; room: EEPROM
R95 R96 R98 R99 R112 R114-R117 R131-R133 = R: Tolerance: TOL?; User Part Number: ERJ-2RKF4991X; part number: R-ERJ-2RKF4991X,R; room: SFP0
R102 = R: Tolerance: TOL?; User Part Number: ERJ-2RKF33R0X; part number: R-ERJ-2RKF33R0X,R; room: MMC_DISCRETE
R105 = R: Tolerance: TOL?; User Part Number: ERJ-PA2F3300X; part number: R-ERJ-PA2F3300X,R; room: MMC_DISCRETE
R106 R136 = R: Tolerance: TOL?; User Part Number: M55342K11B10E0RS3; part number: R-M55342K11B10E0RS3,R
R107-R109 R113 = R: Tolerance: TOL?; User Part Number: ERJ-2RKF1001X; part number: R-ERJ-2RKF1001X,R; room: MMC_DISCRETE
R110 = R: Tolerance: TOL?; User Part Number: ERA-2AEB303X; part number: R-ERA-2AEB303X,R; room: MMC_DISCRETE
R119 R120 R126 = R: Tolerance: TOL?; User Part Number: ERJ-2RKF2201X; part number: R-ERJ-2RKF2201X,R; room: SFP I2C SWITCH
R134 = R: Tolerance: TOL?; User Part Number: ERJ-2RKF1000X; part number: R-ERJ-2RKF1000X,R; room: SFP_DFF_AND_FANOUT
R135 = R: Tolerance: TOL?; User Part Number: EMA-00003608; part number: R-EMA-00003608,R; room: VCC3V3I_V
R138 = R: Tolerance: TOL?; User Part Number: CRCW060310M0FKEAC; part number: R-CRCW060310M0FKEAC,R
SW1 = HDT0001: part number: HDT0001-HDT0001,HDT0001; room: MMC
T1 T2 = TRANS MOSFET: part number: TRANS MOSFET_GSD-PJE8408,SOT523; room: POWER
TE1 = CON7P: part number: CON7P-5607-5102-SH
TP1-TP3 = TP: part number: TP_HOLE-1.0MM
TP4-TP6 TP15 = TESTPOINT: part number: TESTPOINT-EMA-00001481V22,TESTPOINT; room: MAIN_PWR
U1 = LP_515XXX: part number: LP_515XXX-5151230F,LP_515XXX
U5 U11 U14 = SFP_CAGE-2227023-1: part number: SFP_CAGE-2227023-1-2227023-1,SFP_CAGE-2227023-1; room: SFP0
U6 = SI5395A-A-GM: part number: SI5395A-A-GM-SI5395A-A-GM,SI5395A-A-GM; room: CLK_GEN_X12
U13 = ATMGA128: part number: ATMGA128-ATMEGA128A-MU,ATMGA128; room: MMC_DISCRETE
U15 = INV_1CH_OD: part number: INV_1CH_OD-SN74LVC1G06DBVTE4,INV_1CH_OD; room: MMC_DISCRETE
U16 = TPS74618P: part number: TPS74618P-TPS74618PQWDRVRQ1,TPS74618P; room: VCC1V8
U18 = 24AA025E48T-I/SN: part number: 24AA025E48T-I/SN-24AA025E48T-I/SN,24AA025E48T-I/SN; room: EEPROM
U25 = LM75A: part number: LM75A-LM75AIMME/NOPB,LM75A

## Footprints (pads in the part's own frame, mm; a bottom-side part is the same pattern mirrored in y, then rotated)
3M_5607-5102-SH
  round 1.1 hole 0.6: 1(3.81,-0.5) 2(2.54,0.5) 3(1.27,0.5) 4(0,-0.5) 5(-1.27,0.5) 6(-2.54,0.5) 7(-3.81,-0.5)
  round 1.85 hole 1.35: 8(-6.48,0) 9(6.48,0)
6-WSON_2X2
  rrect 0.5x0.3 smd: 1(-0.95,0.65) 2(-0.95,0) 3(-0.95,-0.65) 4(0.95,-0.65) 5(0.95,0) 6(0.95,0.65)
  rrect 0.9x1.6 smd: 7(0,0)
AMC0_R2_BPLUS_PCB_EDGE
  rect 1.3x0.5 smd: (-0.888,21) (-0.888,9.75) (-0.888,-1.5) (-0.888,-12.75) (-0.888,-19.5) (-0.888,-26.25) (-0.888,-27.75) (-0.888,-27.75) (-0.888,-28.5) (-0.888,-28.5) (-0.888,-29.25) (-0.888,-30) (-0.888,-30.75)
  rect 1.7x0.5 smd: (-0.7,30.75) (-0.7,30) (-0.7,28.5) (-0.7,28.5) (-0.7,27.75) (-0.7,27.75) (-0.7,26.25) (-0.7,26.25) (-0.7,25.5) (-0.7,25.5) (-0.7,24) (-0.7,24) (-0.7,23.25) (-0.7,23.25) (-0.7,21.75) (-0.7,21) (-0.7,19.5) (-0.7,19.5) (-0.7,18.75) (-0.7,18.75) (-0.7,17.25) (-0.7,17.25) (-0.7,16.5) (-0.7,16.5) (-0.7,15) (-0.7,15) (-0.7,14.25) (-0.7,14.25) (-0.7,12.75) (-0.7,12.75) (-0.7,12) (-0.7,10.5) (-0.7,9.75) (-0.7,8.25) (-0.7,8.25) (-0.7,7.5) (-0.7,7.5) (-0.7,6) (-0.7,6) (-0.7,5.25) (-0.7,5.25) (-0.7,3.75) (-0.7,3.75) (-0.7,3) (-0.7,3) (-0.7,1.5) (-0.7,1.5) (-0.7,0.75) (-0.7,0.75) (-0.7,-0.75) (-0.7,-1.5) (-0.7,-3) (-0.7,-3) (-0.7,-3.75) (-0.7,-3.75) (-0.7,-5.25) (-0.7,-5.25) (-0.7,-6) (-0.7,-6) (-0.7,-7.5) (-0.7,-7.5) (-0.7,-8.25) (-0.7,-8.25) (-0.7,-9.75) (-0.7,-9.75) (-0.7,-10.5) (-0.7,-10.5) (-0.7,-12) (-0.7,-12.75) (-0.7,-14.25) (-0.7,-14.25) (-0.7,-15) (-0.7,-15) (-0.7,-16.5) (-0.7,-16.5) (-0.7,-17.25) (-0.7,-17.25) (-0.7,-18.75) (-0.7,-19.5) (-0.7,-21) (-0.7,-21) (-0.7,-21.75) (-0.7,-21.75) (-0.7,-23.25) (-0.7,-23.25) (-0.7,-24) (-0.7,-24) (-0.7,-25.5) (-0.7,-26.25)
  rect 2x0.5 smd: (-0.55,30) (-0.55,-30)
  rect 3.1x0.5 smd: 1(0,-31.5) 2(0,-30.75) 4(0,-29.25) 7(0,-27) 9(0,-25.5) 10(0,-24.75) 13(0,-22.5) 16(0,-20.25) 18(0,-18.75) 19(0,-18) 22(0,-15.75) 25(0,-13.5) 27(0,-12) 28(0,-11.25) 31(0,-9) 34(0,-6.75) 37(0,-4.5) 40(0,-2.25) 42(0,-0.75) 43(0,0) 46(0,2.25) 49(0,4.5) 52(0,6.75) 55(0,9) 57(0,10.5) 58(0,11.25) 61(0,13.5) 64(0,15.75) 67(0,18) 70(0,20.25) 72(0,21.75) 73(0,22.5) 76(0,24.75) 79(0,27) 82(0,29.25) 84(0,30.75) 85(0,31.5) 86(0,31.5) 89(0,29.25) 92(0,27) 95(0,24.75) 98(0,22.5) 101(0,20.25) 104(0,18) 107(0,15.75) 110(0,13.5) 112(0,12) 113(0,11.25) 116(0,9) 119(0,6.75) 122(0,4.5) 125(0,2.25) 128(0,0) 131(0,-2.25) 134(0,-4.5) 137(0,-6.75) 140(0,-9) 143(0,-11.25) 146(0,-13.5) 149(0,-15.75) 152(0,-18) 155(0,-20.25) 158(0,-22.5) 161(0,-24.75) 164(0,-27) 170(0,-31.5)
  rect 0.9x0.5 smd: 3(1.1,-30) 83(1.1,30)
  rect 1.6x0.5 smd: 5(0.762,-28.5) 6(0.762,-27.75) 8(0.762,-26.25) 17(0.762,-19.5) 26(0.762,-12.75) 41(0.762,-1.5) 56(0.762,9.75) 71(0.762,21) 165(0.762,-27.75) 166(0.762,-28.5) 167(0.762,-29.25) 168(0.762,-30) 169(0.762,-30.75)
  rect 1.2x0.5 smd: 11(0.95,-24) 12(0.95,-23.25) 14(0.95,-21.75) 15(0.95,-21) 20(0.95,-17.25) 21(0.95,-16.5) 23(0.95,-15) 24(0.95,-14.25) 29(0.95,-10.5) 30(0.95,-9.75) 32(0.95,-8.25) 33(0.95,-7.5) 35(0.95,-6) 36(0.95,-5.25) 38(0.95,-3.75) 39(0.95,-3) 44(0.95,0.75) 45(0.95,1.5) 47(0.95,3) 48(0.95,3.75) 50(0.95,5.25) 51(0.95,6) 53(0.95,7.5) 54(0.95,8.25) 59(0.95,12) 60(0.95,12.75) 62(0.95,14.25) 63(0.95,15) 65(0.95,16.5) 66(0.95,17.25) 68(0.95,18.75) 69(0.95,19.5) 74(0.95,23.25) 75(0.95,24) 77(0.95,25.5) 78(0.95,26.25) 80(0.95,27.75) 81(0.95,28.5) 87(0.95,30.75) 88(0.95,30) 90(0.95,28.5) 91(0.95,27.75) 93(0.95,26.25) 94(0.95,25.5) 96(0.95,24) 97(0.95,23.25) 99(0.95,21.75) 100(0.95,21) 102(0.95,19.5) 103(0.95,18.75) 105(0.95,17.25) 106(0.95,16.5) 108(0.95,15) 109(0.95,14.25) 111(0.95,12.75) 114(0.95,10.5) 115(0.95,9.75) 117(0.95,8.25) 118(0.95,7.5) 120(0.95,6) 121(0.95,5.25) 123(0.95,3.75) 124(0.95,3) 126(0.95,1.5) 127(0.95,0.75) 129(0.95,-0.75) 130(0.95,-1.5) 132(0.95,-3) 133(0.95,-3.75) 135(0.95,-5.25) 136(0.95,-6) 138(0.95,-7.5) 139(0.95,-8.25) 141(0.95,-9.75) 142(0.95,-10.5) 144(0.95,-12) 145(0.95,-12.75) 147(0.95,-14.25) 148(0.95,-15) 150(0.95,-16.5) 151(0.95,-17.25) 153(0.95,-18.75) 154(0.95,-19.5) 156(0.95,-21) 157(0.95,-21.75) 159(0.95,-23.25) 160(0.95,-24) 162(0.95,-25.5) 163(0.95,-26.25)
C0402
  rect 0.6x0.6 smd: 1(-0.45,0) 2(0.45,0)
C0603
  rect 0.9x1 smd: 1(-0.75,0) 2(0.75,0)
CAP0402
  rect 0.635x0.686 smd: 1(-0.499,0) 2(0.499,0)
CAP0603
  rect 1.05x1.08 smd: 1(-0.865,0) 2(0.865,0)
CAP0805
  rect 1.3x1.5 smd: 1(-1,0) 2(1,0)
CAP1206
  rect 1.5x2 smd: 1(-1.5,0) 2(1.5,0)
CAP2917
  rect 2.4x2.9 smd: 1(-3.048,0) 2(3.048,0)
D0603
  rect 1.05x1.08 smd: 1(-0.865,0) 2(0.865,0)
FTSH-115-01-L-DV
  rect 0.75x2.8 smd: 1(-8.255,-2.03) 2(-8.255,2.03) 3(-6.985,-2.03) 4(-6.985,2.03) 5(-5.715,-2.03) 6(-5.715,2.03) 7(-4.445,-2.03) 8(-4.445,2.03) 9(-3.175,-2.03) 10(-3.175,2.03) 11(-1.905,-2.03) 12(-1.905,2.03) 13(-0.635,-2.03) 14(-0.635,2.03) 15(0.635,-2.03) 16(0.635,2.03) 17(1.905,-2.03) 18(1.905,2.03) 19(3.175,-2.03) 20(3.175,2.03) 21(4.445,-2.03) 22(4.445,2.03) 23(5.715,-2.03) 24(5.715,2.03) 25(6.985,-2.03) 26(6.985,2.03) 27(8.255,-2.03) 28(8.255,2.03) 29(9.525,-2.032) 30(9.525,2.032)
HDR14PINSMD
  round 1.092 hole 0.991 unplated: (-5.004,0) (5.004,0)
  rect 0.991x2.743 smd: 1(5.994,2.134) 2(5.994,-2.134) 3(3.988,2.134) 4(3.988,-2.134) 5(2.007,2.134) 6(2.007,-2.134) 7(0,2.134) 8(0,-2.134) 9(-2.007,2.134) 10(-2.007,-2.134) 11(-3.988,2.134) 12(-3.988,-2.134) 13(-5.994,2.134) 14(-5.994,-2.134)
HDR_1X3
  round 1.524 hole 0.889: 1(0,0) 2(2.54,0) 3(5.08,0)
HIROSE_U-FL-R-SMT-1_10
  rect 1.05x1 smd: 1(0,1.525)
  rect 1.05x2.2 smd: 2(-1.475,0) 3(1.475,0)
INDC1608X95N
  rect 1x1 smd: 1(-0.75,0) 2(0.75,0)
INDC2013X105N
  rect 1.15x1.45 smd: 1(-0.9,0) 2(0.9,0)
LEDC1608X80N
  rect 0.9x0.95 smd: 1(-0.8,0) 2(0.8,0)
LP_515XXX
  round 1.524 hole 1.524 unplated: (-2.032,3.988) (0,0) (0,-3.988)
MOLEX_53398-0471
  rect 2.1x3 smd: (-3.175,-0.95) (5.675,-0.95)
  rect 0.8x1.3 smd: 1(-0.625,1.8) 2(0.625,1.8) 3(1.875,1.8) 4(3.125,1.8)
MOUNTHOLE
  round 6.096 hole 3.302: 1(0,0)
OSCSC254P500X700X100-6N
  rect 1.65x1.55 smd: 1(-2.2,2.54) 2(-2.2,0) 3(-2.2,-2.54) 4(2.2,-2.54) 5(2.2,0) 6(2.2,2.54)
PWS_TI_ECP-R-PDSS-T14
  round 2.1 hole 1.4: 1(-15.875,6.35) 2(-15.875,-6.35) 3(-12.7,-6.35) 4(-6.35,-6.35) 5(-3.175,-6.35) 6(0,-6.35) 7(3.175,-6.35) 8(9.525,-6.35) 9(12.7,-6.35) 10(15.875,-6.35) 11(15.875,-3.175) 12(15.875,0) 13(15.875,3.175) 14(15.875,6.35)
QFN50P300X300X90-17N-S160
  rect 0.85x0.25 smd: 1(-1.45,0.75) 2(-1.45,0.25) 3(-1.45,-0.25) 4(-1.45,-0.75) 9(1.45,-0.75) 10(1.45,-0.25) 11(1.45,0.25) 12(1.45,0.75)
  rect 0.25x0.85 smd: 5(-0.75,-1.45) 6(-0.25,-1.45) 7(0.25,-1.45) 8(0.75,-1.45) 13(0.75,1.45) 14(0.25,1.45) 15(-0.25,1.45) 16(-0.75,1.45)
  rect 1.6x1.6 smd: 17(0,0)
QFN50P500X500X100-33N-S285
  rect 0.8x0.3 smd: 1(-2.5,1.75) 2(-2.5,1.25) 3(-2.5,0.75) 4(-2.5,0.25) 5(-2.5,-0.25) 6(-2.5,-0.75) 7(-2.5,-1.25) 8(-2.5,-1.75) 17(2.5,-1.75) 18(2.5,-1.25) 19(2.5,-0.75) 20(2.5,-0.25) 21(2.5,0.25) 22(2.5,0.75) 23(2.5,1.25) 24(2.5,1.75)
  rect 0.3x0.8 smd: 9(-1.75,-2.5) 10(-1.25,-2.5) 11(-0.75,-2.5) 12(-0.25,-2.5) 13(0.25,-2.5) 14(0.75,-2.5) 15(1.25,-2.5) 16(1.75,-2.5) 25(1.75,2.5) 26(1.25,2.5) 27(0.75,2.5) 28(0.25,2.5) 29(-0.25,2.5) 30(-0.75,2.5) 31(-1.25,2.5) 32(-1.75,2.5)
  rect 2.85x2.85 smd: 33(0,0)
QFN_64
  rect 0.61x0.279 smd: 1(-4.394,3.75) 2(-4.394,3.25) 3(-4.394,2.75) 4(-4.394,2.25) 5(-4.394,1.75) 6(-4.394,1.25) 7(-4.394,0.75) 8(-4.394,0.25) 9(-4.394,-0.25) 10(-4.394,-0.75) 11(-4.394,-1.25) 12(-4.394,-1.75) 13(-4.394,-2.25) 14(-4.394,-2.75) 15(-4.394,-3.25) 16(-4.394,-3.75) 33(4.394,-3.75) 34(4.394,-3.25) 35(4.394,-2.75) 36(4.394,-2.25) 37(4.394,-1.75) 38(4.394,-1.25) 39(4.394,-0.75) 40(4.394,-0.25) 41(4.394,0.25) 42(4.394,0.75) 43(4.394,1.25) 44(4.394,1.75) 45(4.394,2.25) 46(4.394,2.75) 47(4.394,3.25) 48(4.394,3.75)
  rect 0.279x0.61 smd: 17(-3.75,-4.394) 18(-3.25,-4.394) 19(-2.75,-4.394) 20(-2.25,-4.394) 21(-1.75,-4.394) 22(-1.25,-4.394) 23(-0.75,-4.394) 24(-0.25,-4.394) 25(0.25,-4.394) 26(0.75,-4.394) 27(1.25,-4.394) 28(1.75,-4.394) 29(2.25,-4.394) 30(2.75,-4.394) 31(3.25,-4.394) 32(3.75,-4.394) 49(3.75,4.394) 50(3.25,4.394) 51(2.75,4.394) 52(2.25,4.394) 53(1.75,4.394) 54(1.25,4.394) 55(0.75,4.394) 56(0.25,4.394) 57(-0.25,4.394) 58(-0.75,4.394) 59(-1.25,4.394) 60(-1.75,4.394) 61(-2.25,4.394) 62(-2.75,4.394) 63(-3.25,4.394) 64(-3.75,4.394)
  rect 4.4x4.4 smd: 65(0,0)
RECPT5X2_100MIL_SM
  rect 3.251x1.27 smd: 1(-2.54,10.16) 2(2.54,10.16) 3(-2.54,7.62) 4(2.54,7.62) 5(-2.54,5.08) 6(2.54,5.08) 7(-2.54,2.54) 8(2.54,2.54) 9(-2.54,0) 10(2.54,0)
RES0402
  rect 0.55x0.6 smd: 1(-0.45,0) 2(0.45,0)
RES0603
  rect 0.95x0.95 smd: 1(-0.75,0) 2(0.75,0)
RES1206
  rect 1.25x1.75 smd: 1(-1.45,0) 2(1.45,0)
SAMTEC_LSHM-130-04-0-L-DV-A-S
  round 1 hole 1.45 unplated: (-8.5,-0.9) (8.5,-0.9)
  rect 0.3x1.5 smd: 1(7.25,-1.9) 2(7.25,1.8) 3(6.75,-1.9) 4(6.75,1.8) 5(6.25,-1.9) 6(6.25,1.8) 7(5.75,-1.9) 8(5.75,1.8) 9(5.25,-1.9) 10(5.25,1.8) 11(4.75,-1.9) 12(4.75,1.8) 13(4.25,-1.9) 14(4.25,1.8) 15(3.75,-1.9) 16(3.75,1.8) 17(3.25,-1.9) 18(3.25,1.8) 19(2.75,-1.9) 20(2.75,1.8) 21(2.25,-1.9) 22(2.25,1.8) 23(1.75,-1.9) 24(1.75,1.8) 25(1.25,-1.9) 26(1.25,1.8) 27(0.75,-1.9) 28(0.75,1.8) 29(0.25,-1.9) 30(0.25,1.8) 31(-0.25,-1.9) 32(-0.25,1.8) 33(-0.75,-1.9) 34(-0.75,1.8) 35(-1.25,-1.9) 36(-1.25,1.8) 37(-1.75,-1.9) 38(-1.75,1.8) 39(-2.25,-1.9) 40(-2.25,1.8) 41(-2.75,-1.9) 42(-2.75,1.8) 43(-3.25,-1.9) 44(-3.25,1.8) 45(-3.75,-1.9) 46(-3.75,1.8) 47(-4.25,-1.9) 48(-4.25,1.8) 49(-4.75,-1.9) 50(-4.75,1.8) 51(-5.25,-1.9) 52(-5.25,1.8) 53(-5.75,-1.9) 54(-5.75,1.8) 55(-6.25,-1.9) 56(-6.25,1.8) 57(-6.75,-1.9) 58(-6.75,1.8) 59(-7.25,-1.9) 60(-7.25,1.8)
  round 1.702 hole 1.016: 61(-9.975,1.1) 62(9.975,1.1)
SAMTEC_LSHM-150-04-0-L-DV-A-S
  round 1 hole 1.45 unplated: (-13.5,-0.9) (13.5,-0.9)
  rect 0.3x1.5 smd: 1(12.25,-1.9) 2(12.25,1.8) 3(11.75,-1.9) 4(11.75,1.8) 5(11.25,-1.9) 6(11.25,1.8) 7(10.75,-1.9) 8(10.75,1.8) 9(10.25,-1.9) 10(10.25,1.8) 11(9.75,-1.9) 12(9.75,1.8) 13(9.25,-1.9) 14(9.25,1.8) 15(8.75,-1.9) 16(8.75,1.8) 17(8.25,-1.9) 18(8.25,1.8) 19(7.75,-1.9) 20(7.75,1.8) 21(7.25,-1.9) 22(7.25,1.8) 23(6.75,-1.9) 24(6.75,1.8) 25(6.25,-1.9) 26(6.25,1.8) 27(5.75,-1.9) 28(5.75,1.8) 29(5.25,-1.9) 30(5.25,1.8) 31(4.75,-1.9) 32(4.75,1.8) 33(4.25,-1.9) 34(4.25,1.8) 35(3.75,-1.9) 36(3.75,1.8) 37(3.25,-1.9) 38(3.25,1.8) 39(2.75,-1.9) 40(2.75,1.8) 41(2.25,-1.9) 42(2.25,1.8) 43(1.75,-1.9) 44(1.75,1.8) 45(1.25,-1.9) 46(1.25,1.8) 47(0.75,-1.9) 48(0.75,1.8) 49(0.25,-1.9) 50(0.25,1.8) 51(-0.25,-1.9) 52(-0.25,1.8) 53(-0.75,-1.9) 54(-0.75,1.8) 55(-1.25,-1.9) 56(-1.25,1.8) 57(-1.75,-1.9) 58(-1.75,1.8) 59(-2.25,-1.9) 60(-2.25,1.8) 61(-2.75,-1.9) 62(-2.75,1.8) 63(-3.25,-1.9) 64(-3.25,1.8) 65(-3.75,-1.9) 66(-3.75,1.8) 67(-4.25,-1.9) 68(-4.25,1.8) 69(-4.75,-1.9) 70(-4.75,1.8) 71(-5.25,-1.9) 72(-5.25,1.8) 73(-5.75,-1.9) 74(-5.75,1.8) 75(-6.25,-1.9) 76(-6.25,1.8) 77(-6.75,-1.9) 78(-6.75,1.8) 79(-7.25,-1.9) 80(-7.25,1.8) 81(-7.75,-1.9) 82(-7.75,1.8) 83(-8.25,-1.9) 84(-8.25,1.8) 85(-8.75,-1.9) 86(-8.75,1.8) 87(-9.25,-1.9) 88(-9.25,1.8) 89(-9.75,-1.9) 90(-9.75,1.8) 91(-10.25,-1.9) 92(-10.25,1.8) 93(-10.75,-1.9) 94(-10.75,1.8) 95(-11.25,-1.9) 96(-11.25,1.8) 97(-11.75,-1.9) 98(-11.75,1.8) 99(-12.25,-1.9) 100(-12.25,1.8)
  round 1.702 hole 1.016: 101(-14.975,1.1) 102(14.975,1.1)
SFP_CAGE
  rect 1.75x1.75 hole 1.05: 1(-30.9,7.125) 2(-20.9,7.125) 3(-10.9,7.125) 5(-25.9,-7.125) 6(-15.9,-7.125) 7(-5.9,-7.125) 8(4.1,-7.125) 9(-30.9,-1.455) 10(-10.9,1.445) 11(-10.9,-3.955)
  rect 1.55x1.55 hole 0.85: 4(-0.9,7.125)
  round 1.65 hole 0.95: 12(-8.1,7.125) 13(-3.4,7.125) 14(1.6,7.125) 15(-8.1,-7.125) 16(-3.4,-7.125) 17(1.6,-7.125) 18(6.2,-4.805) 19(6.2,-0.005) 20(6.2,4.796)
SOD123
  rect 1x0.75 smd: A(1.8,0) C(-1.8,0)
SOIC8
  rect 1.778x0.635 smd: 1(-2.489,1.905) 2(-2.489,0.635) 3(-2.489,-0.635) 4(-2.489,-1.905) 5(2.489,-1.905) 6(2.489,-0.635) 7(2.489,0.635) 8(2.489,1.905)
SOP50P490X110-16N
  rect 1.4x0.3 smd: 1(-2.2,1.75) 2(-2.2,1.25) 3(-2.2,0.75) 4(-2.2,0.25) 5(-2.2,-0.25) 6(-2.2,-0.75) 7(-2.2,-1.25) 8(-2.2,-1.75) 9(2.2,-1.75) 10(2.2,-1.25) 11(2.2,-0.75) 12(2.2,-0.25) 13(2.2,0.25) 14(2.2,0.75) 15(2.2,1.25) 16(2.2,1.75)
SOT23-5
  rect 1.016x0.711 smd: 1(-1.295,0.953) 2(-1.295,0) 3(-1.295,-0.953) 4(1.295,-0.953) 5(1.295,0.953)
SOTFL50P160X60-3N
  rect 0.55x0.4 smd: 1(-0.8,0.5) 2(-0.8,-0.5) 3(0.8,0)
SW_HDT0001
  round 0.5 hole 0.6 unplated: (-0.85,0)
  round 0.5 hole 0.8 unplated: (0.85,0)
  rect 0.6x1 smd: 1(1.1,-1.35) 2(-1.1,-1.35) 3(1.1,1.35) 4(-1.1,1.35)
TOSHIBA_11-4M1S
  rect 1.2x0.8 smd: 1(-3.15,1.27) 3(-3.15,-1.27) 4(3.15,-1.27) 6(3.15,1.27)
TP_HOLE_10
  round 1.6 hole 1.016: 1(0,0)
TP_KEYSTONE_5000A
  round 1.65 hole 1: 1(0,0)
TSSOP8_65P440X300MM
  rect 1.549x0.381 smd: 1(-2.875,0.975) 2(-2.875,0.325) 3(-2.875,-0.325) 4(-2.875,-0.975) 5(2.875,-0.975) 6(2.875,-0.325) 7(2.875,0.325) 8(2.875,0.975)
TYCO_1367073
  round 1 hole 1.55 unplated: (0,4.795) (0,-4.805)
  rect 2x0.5 smd: 1(-4.1,3.395) 2(-4.1,2.595) 3(-4.1,1.795) 4(-4.1,0.995) 5(-4.1,0.195) 6(-4.1,-0.605) 7(-4.1,-1.405) 8(-4.1,-2.205) 9(-4.1,-3.005) 10(-4.1,-3.805) 11(4.1,-3.405) 12(4.1,-2.605) 13(4.1,-1.805) 14(4.1,-1.005) 15(4.1,-0.205) 16(4.1,0.595) 17(4.1,1.395) 18(4.1,2.195) 19(4.1,2.995) 20(4.1,3.795)

## Nets
1V8_POST_RSHUNT: IC6.4 U16.4 U16.6
AVDD: L2.2 QZ1.1 QZ1.6
GND: C8.1 C9.2 C13.1 C16.2 C17.2 C19.1 C20.2 C25.2 C38.2 C42.2 C46.2 C47.2 C48.2 C52.2 C53.2 C66.2 C77.2 C80.2 C86.2 C87.2 C88.2 C89.2 C90.2 C91.1 C92.2 C93.2 C95.2 C96.2 C103.2 C107.2 C108.2 C109.2 C110.2 C114.1 C116.1 C117.2 C118.1 C120.1 C122.1 C124.1 C125.1 C134.1 C135.1 C136.1 C138.1 C139.1 C140.2 C142.1 C143.2 C144.2 C145.2 C146.1 C147.2 C148.1 C149.1 C150.1 C151.1 C152.1 C153.1 C154.1 C155.2 C159.1 C160.1 C163.1 C165.1 C172.1 C174.1 D4.1(K) D6.1(K) D8.1(K) D9.1(K) D10.1(K) D11.1(K) IC1.6 IC1.7 IC1.14 IC1.15 IC1.17 IC2.6 IC2.7 IC2.14 IC2.15 IC2.17 IC3.33 IC4.33 IC5.3 IC5.4(EMITTER) IC6.9 J1.1 J1.7 J1.19 J1.25 J1.30 J1.33 J1.43 J1.53 J1.54 J1.63 J1.64 J1.73 J1.74 J1.83 J1.89 J1.101 J1.102 J2.1 J2.2 J2.3 J2.5 J2.8 J2.10 J2.11 J2.13 J2.16 J2.18 J2.19 J2.21 J2.24 J2.26 J2.27 J2.29 J2.32 J2.34 J2.35 J2.37 J2.40 J2.42 J2.43 J2.45 J2.48 J2.50 J2.51 J2.52 J2.53 J2.54 J2.55 J2.56 J2.57 J2.58 J2.59 J2.60 J2.61 J2.62(F2) J3.1 J3.9 J3.10 J3.11 J3.14 J3.17 J3.20(VEET2) J4.3 J4.4 J4.7 J4.8 J4.11 J4.12 J4.15 J4.16 J4.19 J4.20 J4.23 J4.24 J4.27 J4.28 J5.5 J5.6 J5.11 J5.12 J5.17 J5.18 J5.23 J5.24 J5.29 J5.30 J5.35 J5.36 J5.45 J5.46 J5.61 J5.62 J6.1 J6.9 J6.10 J6.11 J6.14 J6.17 J6.20(VEET2) J7.1 J7.7 J7.10 J7.13 J7.16 J7.19 J7.22 J7.25 J7.28 J7.31 J7.34 J7.37 J7.40 J7.43 J7.46 J7.49 J7.52 J7.55 J7.58 J7.61 J7.64 J7.67 J7.70 J7.73 J7.76 J7.79 J7.82 J7.85 J7.86 J7.89 J7.92 J7.95 J7.98 J7.101 J7.104 J7.107 J7.110 J7.113 J7.116 J7.119 J7.122 J7.125 J7.128 J7.131 J7.134 J7.137 J7.140 J7.143 J7.146 J7.149 J7.152 J7.155 J7.158 J7.161 J7.164 J8.19 J8.29 J8.39 J8.40 J8.49 J8.50 J8.59 J8.60 J8.69 J8.70 J8.79 J8.80 J8.89 J8.101 J8.102 J9.1 J9.2 J9.3 J9.5 J9.8 J9.10 J9.11 J9.13 J9.16 J9.18 J9.19 J9.21 J9.24 J9.26 J9.27 J9.29 J9.32 J9.34 J9.35 J9.37 J9.40 J9.42 J9.43 J9.45 J9.48 J9.50 J9.51 J9.53 J9.56 J9.58 J9.59 J9.61 J9.64 J9.66 J9.67 J9.69 J9.72 J9.74 J9.75 J9.77 J9.80 J9.82 J9.83 J9.85 J9.88 J9.90 J9.91 J9.93 J9.96 J9.98 J9.99 J9.100 J9.101 J9.102(F2) J10.1 J10.3 J10.5 J10.7 J10.9 J10.11 J11.1 J11.9 J11.10 J11.11 J11.14 J11.17 J11.20(VEET2) J14.2 J14.3 J15.2 J15.3 J16.1 J16.3 MH1.1(MH_SIG) MH2.1(MH_SIG) MH3.1(MH_SIG) MH4.1(MH_SIG) MH6.1(MH_SIG) MH7.1(MH_SIG) MH8.1(MH_SIG) MH9.1(MH_SIG) P1.2 P1.10 POWER1.3 POWER1.4 POWER1.7 POWER1.8 POWER1.11 PWR1.3 PWR1.4 PWR1.7 PWR1.8 PWR1.11 QZ1.3 R60.1 R64.1 R66.1 R70.1 R77.2 R82.1 R105.2 R110.1 R136.2 R138.2 SW1.1 SW1.2 T1.2(S) T2.2(S) TE1.1 TE1.4 TE1.7(A<6>) TIMING1.6 TIMING1.7 TIMING1.14 TIMING1.15 TIMING1.17 U5.1 U5.2 U5.3 U5.4 U5.5 U5.6 U5.7 U5.8 U5.9 U5.10 U5.11 U5.12 U5.13 U5.14 U5.15 U5.16 U5.17 U5.18 U5.19(CG_9) U5.20 U6.17 U6.19 U6.25 U6.48 U6.65 U11.1 U11.2 U11.3 U11.4 U11.5 U11.6 U11.7 U11.8 U11.9 U11.10 U11.11 U11.12 U11.13 U11.14 U11.15 U11.16 U11.17 U11.18 U11.19(CG_9) U11.20 U13.22 U13.53 U13.63 U13.65 U14.1 U14.2 U14.3 U14.4 U14.5 U14.6 U14.7 U14.8 U14.9 U14.10 U14.11 U14.12 U14.13 U14.14 U14.15 U14.16 U14.17 U14.18 U14.19(CG_9) U14.20 U15.3 U16.3 U16.7 U18.4(VSS) U25.4 U25.5 U25.6 U25.7
P1V5_OUT: J8.20 TP3.1(A<0>)
P1V8_OUT: J1.40 TP2.1(A<0>)
P2V5: C13.2(B<0>) C44.1 C114.2(B<0>) C116.2(B<0>) C118.2(B<0>) C120.2(B<0>) C122.2(B<0>) C124.2(B<0>) C125.2(B<0>) C163.2(B<0>) IC1.5 IC1.8 IC1.13 IC1.16 IC2.5 IC2.8 IC2.13 IC2.16 IC6.3 IC6.8(V8) J1.10 J1.12 J8.2 J8.4 J8.8 J8.10 L1.2 L2.1 R40.1 R42.1 R62.2 R63.2 R69.2(B<0>) R101.1 R118.1 TIMING1.5 TIMING1.8 TIMING1.13 TIMING1.16 TP6.1(TP)
P3V3_OUT0: J1.13 TP1.1(A<0>)
P3V3_OUT1: J8.9 J8.11
VCC2V5_PRE_RSHUNT: C16.1 C17.1 C48.1 IC6.7 PWR1.5 PWR1.9(VO<1>) R62.1 R81.1 TP4.1(TP)
VCC3V3: C66.1 C77.1 C86.1 C87.1 C91.2 C107.1 C108.1 C140.1 IC6.2 IC6.16 J1.14 J1.16 J8.1 J8.3 J8.5 J8.7(VIN7) L6.2 R13.1 R59.1 R76.1 R78.1 R84.2(B<0>) R95.1 R96.1 R97.2 R98.1 R99.1 R106.1 R112.1 R114.1 R115.1 R116.1 R117.1 R119.1 R120.1 R126.1 R131.1 R132.1 R133.1 R135.2 TP15.1(TP) U18.8
VCC3V3_PRE_RSHUNT: C80.1 C92.1 C95.1 IC6.1 POWER1.5 POWER1.9(VO<1>) R83.1 R97.1 TP5.1(TP)
VCCR_3V3: C109.1 C110.1 J6.15
VCCR_3V3_1: C88.1 C89.1 C90.1 J11.15
VCCR_3V3_2: C143.1 C144.1 C145.1 J3.15
VCCT_3V3: C117.1 J6.16
VCCT_3V3_1: C96.1 J11.16 L6.1
VCCT_3V3_2: J3.16
VDD_CLK: C134.2(B<0>) C138.2(B<0>) C142.2(B<0>) C172.2(B<0>) C174.2(B<0>) U6.32 U6.46 U6.60
VDD_CLK_BUFFER: C8.2(B<0>) C9.1 C19.2(B<0>) C20.1 C38.1 C135.2(B<0>) C136.2(B<0>) C147.1 C148.2(B<0>) C155.1 C165.2(B<0>) IC3.10 IC3.15 IC3.16 IC3.25 IC3.26 IC3.31 IC4.10 IC4.15 IC4.16 IC4.25 IC4.26 IC4.31
VDDA_CLK: U6.13
VDDO_CLK: C146.2(B<0>) C149.2(B<0>) C150.2(B<0>) C151.2(B<0>) C152.2(B<0>) C153.2(B<0>) C154.2(B<0>) C159.2(B<0>) C160.2(B<0>) L1.1 U6.22 U6.26 U6.29 U6.33 U6.36 U6.40 U6.43 U6.49 U6.52 U6.57
A0: U18.1
A1: R76.2 U18.2
A2: R77.1 R78.2 U18.3
AMC_GA<0>: J7.5 R44.2 U13.11
AMC_GA<1>: J7.17 U13.12
AMC_GA<2>: J7.26 R47.2 U13.13
AMC_N_ENABLE: U15.2
AMC_N_PS<0>: D12.C(CATHODE) J7.83
AMC_N_PS<1>: J7.3 R102.1 U13.4
AUX_GBE_RX_N: J5.7 TE1.5
AUX_GBE_RX_P: J5.9 TE1.6
AUX_GBE_TX_N: J5.8 TE1.3
AUX_GBE_TX_P: J5.10 TE1.2
AUXIO_N0: J1.68 J4.1
AUXIO_N1: J1.70 J4.5
AUXIO_N2: J1.78 J4.9
AUXIO_N3: J1.82 J4.13
AUXIO_N4: J1.85 J4.17
AUXIO_N5: J1.94 J4.21
AUXIO_N6: J1.98 J4.25
AUXIO_N7: J1.93 J4.29
AUXIO_P0: J1.66 J4.2
AUXIO_P1: J1.72 J4.6
AUXIO_P2: J1.76 J4.10
AUXIO_P3: J1.84 J4.14
AUXIO_P4: J1.87 J4.18
AUXIO_P5: J1.92 J4.22
AUXIO_P6: J1.96 J4.26
AUXIO_P7: J1.95 J4.30
BLUE_LED: R6.2 U13.17
CLK_INTR: J8.21 U6.12
CLK_LOL: J8.23 U6.47
CLK_N<0>: J1.62 U6.50
CLK_N<1>: J5.39 U6.53
CLK_P<0>: J1.60 U6.51
CLK_P<1>: J5.37 U6.54
CLK_RST: U6.6
CLK_SCL: J1.88 R119.2 U6.16 U18.6
CLK_SDA: J1.86 R120.2 U6.18 U18.5
CLK_SEL0: J8.13 U6.3
CLK_SEL1: J8.15 U6.4
CLK_TST_N: U6.41
CLK_TST_P: U6.42
CLKIN_N<0>: C36.2 R27.2 U6.64
CLKIN_N<1>: C28.2 U6.2
CLKIN_N<2>: U6.15
CLKIN_N<3>: C33.2 U6.62
CLKIN_P<0>: C35.2 R27.1 U6.63
CLKIN_P<1>: C31.2 U6.1
CLKIN_P<2>: U6.14
CLKIN_P<3>: C34.2 U6.61
DATA_FROM_UPSTREAM_N<0>: C43.1 J5.60
DATA_FROM_UPSTREAM_N<1>: C1.1 J1.22
DATA_FROM_UPSTREAM_N<2>: C40.1 J5.59
DATA_FROM_UPSTREAM_P<0>: C45.1 J5.58
DATA_FROM_UPSTREAM_P<1>: C2.1 J1.24
DATA_FROM_UPSTREAM_P<2>: C39.1 J5.57
DATA_IN_N<0>: J1.20 J9.6
DATA_IN_N<1>: J1.26 J9.9
DATA_IN_N<2>: J1.34 J9.14
DATA_IN_N<3>: J1.36 J9.17
DATA_IN_N<4>: J1.44 J9.22
DATA_IN_N<5>: J1.52 J9.25
DATA_IN_N<6>: J1.55 J9.30
DATA_IN_N<7>: J1.49 J9.33
DATA_IN_N<8>: J1.39 J9.38
DATA_IN_N<9>: J1.37 J9.41
DATA_IN_N<10>: J1.21 J9.46
DATA_IN_N<11>: J1.15 J9.49
DATA_IN_P<0>: J1.18 J9.4
DATA_IN_P<1>: J1.28 J9.7
DATA_IN_P<2>: J1.32 J9.12
DATA_IN_P<3>: J1.38 J9.15
DATA_IN_P<4>: J1.42 J9.20
DATA_IN_P<5>: J1.50 J9.23
DATA_IN_P<6>: J1.57 J9.28
DATA_IN_P<7>: J1.51 J9.31
DATA_IN_P<8>: J1.41 J9.36
DATA_IN_P<9>: J1.35 J9.39
DATA_IN_P<10>: J1.23 J9.44
DATA_IN_P<11>: J1.17 J9.47
DATA_OUT_N<0>: J8.31 J9.54
DATA_OUT_N<1>: J8.35 J9.57
DATA_OUT_N<2>: J8.41 J9.62
DATA_OUT_N<3>: J8.48 J9.65
DATA_OUT_N<4>: J8.54 J9.70
DATA_OUT_N<5>: J8.53 J9.73
DATA_OUT_N<6>: J8.61 J9.78
DATA_OUT_N<7>: J8.62 J9.81
DATA_OUT_N<8>: J8.73 J9.86
DATA_OUT_N<9>: J8.77 J9.89
DATA_OUT_N<10>: J8.87 J9.94
DATA_OUT_N<11>: J8.97 J9.97
DATA_OUT_P<0>: J8.33 J9.52
DATA_OUT_P<1>: J8.37 J9.55
DATA_OUT_P<2>: J8.43 J9.60
DATA_OUT_P<3>: J8.46 J9.63
DATA_OUT_P<4>: J8.52 J9.68
DATA_OUT_P<5>: J8.51 J9.71
DATA_OUT_P<6>: J8.63 J9.76
DATA_OUT_P<7>: J8.64 J9.79
DATA_OUT_P<8>: J8.71 J9.84
DATA_OUT_P<9>: J8.75 J9.87
DATA_OUT_P<10>: J8.85 J9.92
DATA_OUT_P<11>: J8.95 J9.95
DC_DC_ENABLE: POWER1.1 PWR1.1 T1.3
DC_REF_CLK_N<0>: IC3.29
DC_REF_CLK_N<1>: IC3.27
DC_REF_CLK_N<2>: IC3.23
DC_REF_CLK_N<3>: IC3.21
DC_REF_CLK_N<4>: IC3.19
DC_REF_CLK_N<5>: C199.1 IC3.17
DC_REF_CLK_N<6>: IC4.29
DC_REF_CLK_N<7>: IC4.27
DC_REF_CLK_N<8>: IC4.23
DC_REF_CLK_N<9>: IC4.21
DC_REF_CLK_N<10>: IC4.19
DC_REF_CLK_N<11>: IC4.17
DC_REF_CLK_P<0>: IC3.30(Q<0>)
DC_REF_CLK_P<1>: IC3.28
DC_REF_CLK_P<2>: IC3.24
DC_REF_CLK_P<3>: IC3.22
DC_REF_CLK_P<4>: IC3.20
DC_REF_CLK_P<5>: IC3.18
DC_REF_CLK_P<6>: IC4.30(Q<0>)
DC_REF_CLK_P<7>: IC4.28
DC_REF_CLK_P<8>: IC4.24
DC_REF_CLK_P<9>: IC4.22
DC_REF_CLK_P<10>: IC4.20
DC_REF_CLK_P<11>: IC4.18
DCDC_3V3_PG: U13.8 U13.51
DCDC_ENABLE: J12.3(P3) U13.42
DFF_CLK_N<1>: R101.2(B<0>)
DFF_CLK_N<2>: R134.1
DFF_CLK_P<0>: C113.2(B<0>)
DFF_CLK_P<2>: R40.2(B<0>) R134.2
DFF_REF_CLK_N<0>: U6.30
DFF_REF_CLK_N<1>: U6.34
DFF_REF_CLK_N<2>: U6.37
DFF_REF_CLK_P<0>: C113.1 U6.31
DFF_REF_CLK_P<1>: U6.35
DFF_REF_CLK_P<2>: U6.38
FBCLK_N: C33.1 U6.58
FBCLK_P: C34.1 U6.59
FPGA_PG: J1.29 R13.2 U13.6
FPGA_TCK: J8.100 R48.2
